# Altium PCB SBH_Charger.PcbDoc (part 3 of 3)
Units mil, origin at the board's own origin, x right, y up, seen from the top; angles counter-clockwise.
Board outline 4700 x 3200 mil, 4 copper layers (Top Layer, Mid Layer 1, Mid Layer 2, Bottom Layer), stack 61.811 mil thick; 160 components, 116 nets, 654 pads, 375 vias.
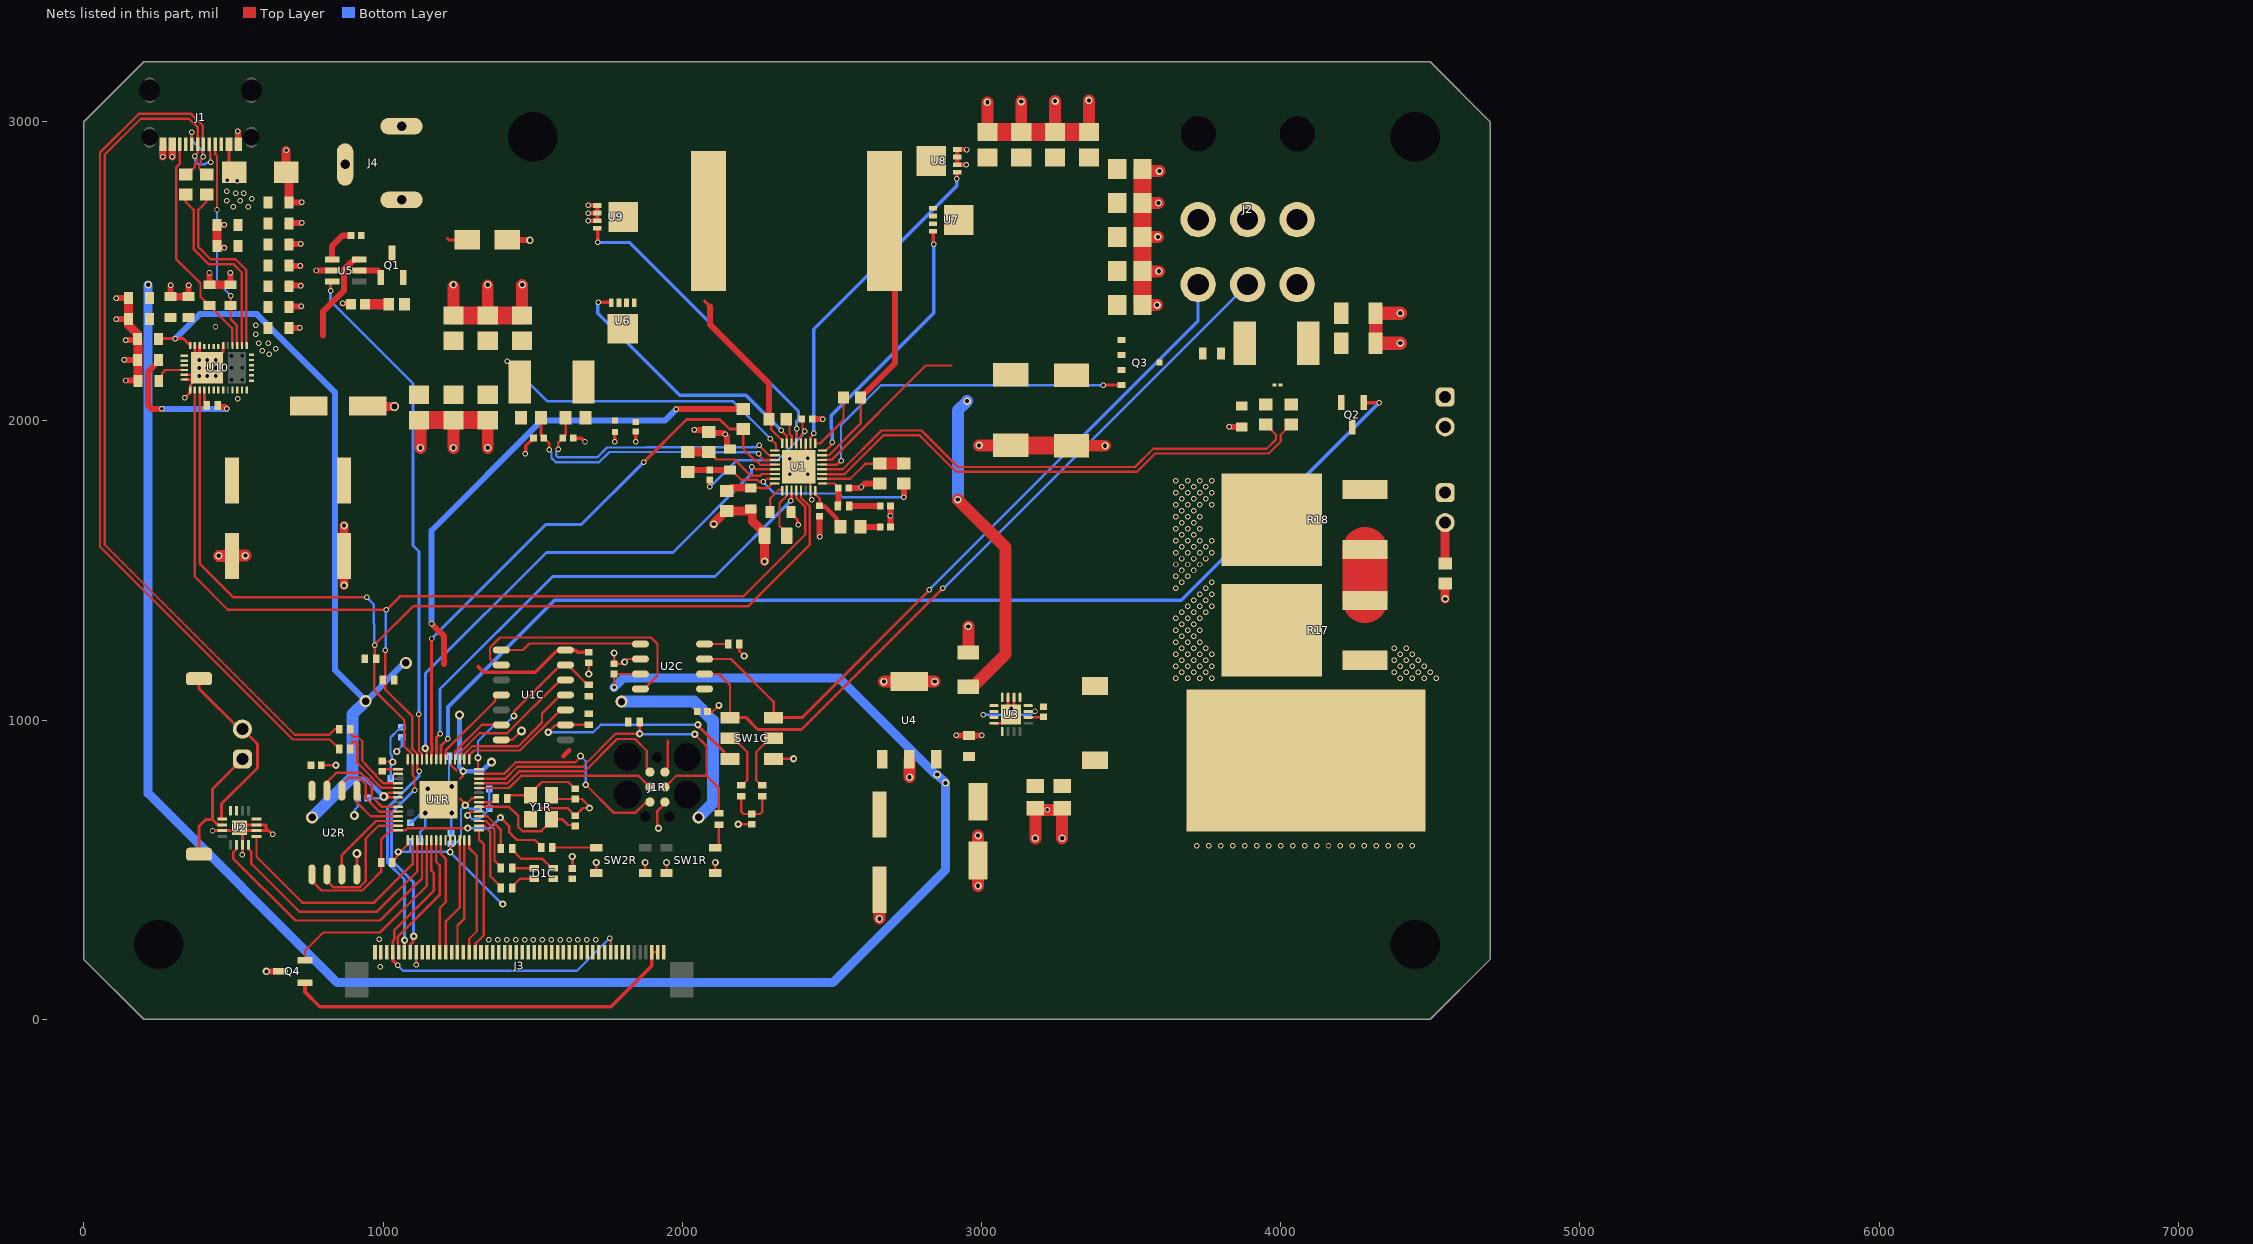
[diagram p4: the nets of this part, all layers, seen from the top]

## Via types
v1: diameter 18.3, hole 11.81, Top Layer to Bottom Layer, tented both sides, 277 vias
v2: diameter 25, hole 14, Top Layer to Bottom Layer, tented both sides, 42 vias
v3: diameter 24, hole 12, Top Layer to Bottom Layer, tented both sides, 37 vias
v4: diameter 30, hole 16, Top Layer to Bottom Layer, tented both sides, 10 vias
v5: diameter 40, hole 25, Top Layer to Bottom Layer, tented both sides, 5 vias
v6: diameter 22.3, hole 12, Top Layer to Bottom Layer, tented both sides, 2 vias
v7: diameter 18, hole 11.81, Top Layer to Bottom Layer, tented both sides, 1 vias
v8: diameter 30, hole 20, Top Layer to Bottom Layer, tented both sides, 1 vias

## Nets (pads, with @x,y where several pads share a name; then routed paths per layer and width w, separated by ;. In a path a pad name is that pad's centre, name@x,y a point inside that pad or via, vN(x,y) a via of type N, cw(c..) or ccw(c..) an arc to the next point about the centre after c; other vN are vias at no path point) (continued)
3V3: C1C.1 C3C.1 C3R.1 C4R.1 C5C.1 C5R.1 C6R.1 C7R.1 C8R.1 C9R.1 C10R.1 C13.1 C64.1 D1C.4 J1R.2 J3.1 J3.7 J3.8 J3.9 J3.35 J3.37 J3.40 J3.41 J3.42 R1C.1 R4.1 R4C.1 R4R.1 R5R.1 R28.1 R29.1 U1C.14 U1R.1 U1R.10 U1R.22 U1R.33 U1R.42 U1R.43 U1R.44 U1R.48 U1R.49 U2.4 U2.7 U2.8 U2C.5 U2R.8 U4.3 U10.38 | length 7086
  Top Layer w8: v4@1002.41,741.56 1049.88,741.56 U1R.49@1049.95,741.5 ; v4(1002.41,744.12) 1004.97,744.12 1018.09,757.24 U1R.48@1049.95,757.24 ; C4R.1@1003.15,823.23 C4R.1@997.41,828.98 1004.35,835.92 1049.88,835.92 U1R.43@1049.95,835.98 U1R.43@1064.27,835.98 ; R5R.1@1031.11,524.12 1031.11,528.06 1048.26,545.21 v3@1048.26,554.97 ; v3@1059.53,561.74 U1R.1@1082.85,585.06 ; U1R.42@1082.85,854.57 1082.85,868.89 U1R.42@1082.92,868.96 ; v3(1224,559) 1224.59,559.59 1224.59,598.22 U1R.10@1224.65,598.29 ; U1R.33@1224.65,868.96 1224.71,868.89 1224.71,851.64 1245.41,830.95 ; 1257.27,737.5 1275.01,719.76 v3(1275.01,715.6) 1298.1,738.69 1304.64,738.69 1307.45,741.5 U1R.22@1320.61,741.5 ; 1257.27,803.95 1265.96,812.63 1265.96,827.67 v3(1267.41,829.12) ; J1R.2@1941.91,826.25 1941.91,832.43 1951.91,842.43 1951.91,868.53 1951.91,931.25
  Top Layer w10: C64.1@249.65,2273.54 251.1,2275 v1(305,2275) 305.1,2274.9 333,2274.9 U10.38@355.29,2252.61 ; C5C.1@1632.41,467 C5C.1@1632.41,469.12
  Top Layer w12: 1317.59,1179.12 1336.4,1160.31 1509.01,1160.31 1580.59,1231.9 1607.47,1231.9 U1C.14@1609.69,1234.12 1610.85,1232.97 1643.42,1232.97 1650.14,1226.25 C1C.1@1687.41,1226.25
  Top Layer w16: v4(1362.41,859.12) v4@1366.19,859.12 ; 1603.59,880.31 1621.22,897.93
  Top Layer w20: v1(1162,1322) 1204,1280 1204,1187 ; v1(1980.5,2039.5) R4.1@2204,2039.5
  Bottom Layer w8: C5R.1@949.53,739.12 991.45,739.12 996.45,744.12 v4(1002.41,744.12) ; v3(1046,895) 1046,896.13 1062.41,912.54 C10R.1@1062.41,939.12 ; v3@1055.77,560.4 1222.6,560.4 v3(1224,559) ; 1090.28,561.68 C7R.1@1090.28,594.12 ; v3(1275.01,715.6) 1275.01,715.37 v3@1273.96,714.32 ; C8R.1@1320.28,704.12 1289.84,704.12 1276.4,717.57 1273.96,717.57 v3@1273.96,714.32 ; v3(1400,385) 1398,385 v3(1224,559) ; v3(1224,559) 1225.7,560.7 1225.7,585.29 C6R.1@1227.41,587 1232.36,591.95 1246.25,591.95 1260.65,606.35 1260.65,701.01 v3@1273.96,714.32
  Bottom Layer w16: 902.41,804.12 942.41,804.12 v4@997.41,749.12 ; v4(1256,1017) 1255.27,1016.27 1255.27,879.86 C9R.1@1254.53,879.12 1254.53,843.08 1267.41,830.2 v3(1267.41,829.12) 1329.98,829.12 1359.98,859.12 v4(1362.41,859.12)
  Bottom Layer w20: v1(305,2275) 387,2357 578,2357 838.87,2096.13 838.87,1167.65 v5@935.26,1071.26 ; v5(941.6,1063.32) 943.46,1063.32 1071.14,1191 v5(1076,1191) ; v1(1162,1322) 1162,1633 1531,2002 1943,2002 v1(1980.5,2039.5)
  Bottom Layer w40: v5(763,675) 763.28,675 897.41,809.12 897.41,1019.12 v5(941.6,1063.32) ; v5(1797,1062) 2038.73,1062 2102.41,998.33 2102.41,722.41 v5(2055,675)
  other v3: 1050.55,559.44
5V: C4C.1 C12.1 C14.1 C16.1 C17.1 C53.1 C54.1 C55.1 C56.1 L2.1 U2C.3 U3.5 U4.1 U10.34 U10.35 | length 6471.5
  Top Layer w8: v3(1772.41,1109.12) C4C.1@1772.41,1154.12 U2C.3@1860.12,1154.12
  Bottom Layer w30: v2(215,2455) 215,755 847.54,122.46 2502.46,122.46 2880,500 v2(2880,790) v2(2852,818) 2846.81,818 2524.81,1140 1803.28,1140 v3(1772.41,1109.12)
AC_N: C46.1 R25.2 U1.2 | length 904.2
  Top Layer w8: v1(1586.15,1905.53) 1586.15,1928.28 1593.06,1935.19 1593.85,1935.19 1600.87,1942.21 1600.87,1943.79 1610,1952.91 R25.2@1610,2010 ; v1(2257,1918) 2257.16,1918 2289.79,1885.37 U1.2@2311.24,1885.37
  Bottom Layer w8: v1(1586.15,1905.53) 1586.15,1902.89 1579.11,1895.84 1579.11,1883.05 1583.79,1878.37 1716.22,1878.37 1748.95,1911.09 1879.86,1911.09 1880.52,1911.75 2247.96,1911.75 2254.21,1918 v1(2257,1918)
AC_P: C45.1 R24.2 U1.3 | length 929.4
  Top Layer w8: C45.1@1537.13,1943 1556.06,1924.06 v1(1556.06,1903) ; v1(2255.93,1889.5) 2255.93,1886.72 2261.2,1881.44 2261.2,1879.89 2271.47,1869.62 U1.3@2311.24,1869.62
  Top Layer w10: R24.2@1528.5,2010 1528.5,1952.41 1537.13,1943.79 C45.1@1537.13,1943
  Bottom Layer w8: v1(1556.06,1903) 1556.06,1900.36 1563.11,1893.31 1563.11,1876.43 1577.17,1862.37 1722.85,1862.37 1756.63,1896.15 2004.41,1896.15 2004.8,1895.75 2246.89,1895.75 2253.14,1889.5 v1(2255.93,1889.5)
AUDIOIN: U1R.2 U2.1 | length 785.4
  Top Layer w8: U2.1@577,610.47 577,543 730,390 970,390 1098.67,518.67 U1R.2@1098.67,598.29
BATDRV: Q3.4 U1.21 | length 1175.9
  Top Layer w8: U1.21@2466.76,1853.87 2516.87,1853.87 2529.24,1866.24 v1(2530.76,1866.24)
  Top Layer w9.84: v1(3407,2119) 3407.5,2119.5 3461.93,2119.5 Q3.4@3462.43,2119
  Bottom Layer w8: v1(2530.76,1866.24) 2530.76,1985.76 2664,2119 v1(3407,2119)
BCLK: U1R.3 U2.16 | length 847.6
  Top Layer w8: U2.16@549.53,583 550.53,582 550.53,569.47 560,560 560,520 720,360 980,360 1114.41,494.41 U1R.3@1114.41,598.29
BKLIGHT: J3.2 J3.3 Q4.2 | length 1332.9
  Top Layer w9.84: J3.3@1898.29,224 J3.2@1917.98,224
  Top Layer w12: Q4.2@739,122.5 739,91 788,42 1762,42 1898.29,178.29 J3.3@1898.29,224
BTST1: C27.1 U1.30 | length 91.6
  Top Layer w8: C27.1@2347.54,2006 2358.57,1994.97 2358.57,1956.91 2365.38,1950.1 U1.30@2365.38,1921.81
BTST2: C28.1 U1.25 | length 202.6
  Top Layer w8: U1.25@2444.12,1924.35 2460.66,1924.35 2539,2002.69 C28.1@2539,2078
CANCLK_RP2CAN: U1C.6 U1R.32 | length 217.3
  Top Layer w8: U1R.32@1240.4,868.96 1240.46,869.02 1240.46,894.46 1330.12,984.12 U1C.6@1395.12,984.12
CANH: J2.4 SW1C.4 U2C.7 | length 2434.3
  Top Layer w8: U2C.7@2074.69,1204.12 2162.41,1204.12 2305.24,1061.29 SW1C.4@2305.24,1008.02
  Top Layer w9.84: SW1C.4@2305.24,1008.02 2400,1008.02
  Top Layer w10: 2400,1008.02 2825,1433.02 v1(2825,1435)
  Bottom Layer w10: v1(2825,1435) 3724.29,2334.29 J2.4@3724.29,2456.06
CANL: J2.5 SW1C.1 U2C.6 | length 2571.6
  Top Layer w8: U2C.6@2074.69,1154.12 2122.41,1154.12 2159.57,1116.96 SW1C.1@2159.57,1008.02
  Top Layer w9.84: 2341,968.81 2398.81,968.81 v1(2870,1440)
  Top Layer w10: SW1C.1@2159.57,1008.02 2213.51,1008.02 2252.72,968.81 2341,968.81
  Bottom Layer w9.84: v1(2870,1440) 2871.56,1441.56 2875.14,1441.56 J2.5@3889.65,2456.06
CANRX_RP2CAN: U1C.2 U2C.4 | length 847.6
  Top Layer w8: U1C.2@1395.12,1184.12 1378.39,1184.12 1357.58,1204.93 1357.58,1242.74 1390.77,1275.93 1895.59,1275.93 1917.41,1254.12 1917.41,1148.9 1872.63,1104.12 U2C.4@1860.12,1104.12
CANTX_RP2CAN: U1C.1 U2C.1 | length 474.9
  Top Layer w8: U1C.1@1395.12,1234.12 1467.41,1234.12 1489.41,1256.12 1858.12,1256.12 U2C.1@1860.12,1254.12
CC1: C58.1 J1.A5 U10.28 | length 703.3
  Top Layer w8: J1.A5@439.21,2925.16 439.21,2890.52 445,2884.73 v1(445,2705) ; v1(491,2419) 491,2386 C58.1@490,2385 490,2340 511.51,2318.49 U10.28@511.51,2252.61
  Bottom Layer w8: v1(445,2705) 445,2465 v1(491,2419)
CC2: C57.1 J1.B5 U10.29 | length 761.2
  Top Layer w8: J1.B5@321.1,2925.16 321.1,2859.83 308.5,2847.23 308.5,2541.5 390,2460 390,2415 404,2401 404,2396 415,2385 C57.1@420,2385 425,2385 436,2374 436,2369 495.76,2309.24 U10.29@495.76,2252.61
CELL_BAT: R2.2 R3.1 U1.18 | length 296.1
  Top Layer w8: U1.18@2464.81,1806.63 2466.76,1806.63 2561.63,1806.63 2612,1857 R3.1@2660,1857
  Top Layer w40: R3.1@2660,1857 R2.2@2740,1857
CHRG_OK: R4.2 U1.4 U1R.37 | length 1946.9
  Top Layer w8: R4.2@2204,1972.5 2204,1906.3 2242.71,1867.59 2246.93,1867.59 2260.65,1853.87 U1.4@2313.19,1853.87
  Top Layer w9.84: U1R.37@1162.64,881.26 1162.64,896.64 1162.92,896.92 1162.92,915.08 1162.64,915.36 v1(1162.64,1272.64) ; v1(1871,1862) 2014,2005 2125,2005 2157.5,1972.5 R4.2@2204,1972.5
  Bottom Layer w9.84: v1(1162.64,1272.64) 1543,1653 1662,1653 v1(1871,1862)
CSX: J3.38 U1R.12 | length 393.7
  Top Layer w8: J3.38@1209.32,224 1209.32,327.32 1256.15,374.15 U1R.12@1256.15,598.29
D_N: SB2.1 U10.27 | length 630.1
  Top Layer w8: SB2.1@340,2756.5 340,2732.5 367,2705.5 367,2574 417,2524 500,2524 527.32,2496.68 U10.27@527.32,2252.61
D_P: SB1.1 U10.26 | length 630.1
  Top Layer w8: SB1.1@410,2756.5 410,2732.5 383,2705.5 383,2580.63 423.63,2540 506.63,2540 543.32,2503.3 U10.26@543.32,2252.61
DBG_TX_RP2040: J1R.5 U1R.27 | length 737.1
  Top Layer w8: U1R.27@1320.61,820.24 1404.61,820.24 1443.5,859.12 1642.48,859.12 1660,876.64 v6(1660,880) ; v6(1677.41,784.12) 1770.78,690.75 1844.03,690.75 1875.13,721.85 1887.51,721.85 J1R.5@1891.91,726.25
  Bottom Layer w8: v6(1660,880) 1677.41,862.59 v6(1677.41,784.12)
DrainLED: J6.1 J7.2 Q2.3 R18.2
DSWITCH: Q2.1 U1R.35 | length 3769.7
  Top Layer w9.84: U1R.35@1193.15,868.96 1193.15,913.15 v1(1217,937)
  Top Layer w12: Q2.1@4277.5,2061 v1(4329,2061)
  Bottom Layer w12: v1(1217,937) 1217,1043.99 1573.01,1400 3668,1400 v1(4329,2061)
GND: C1C.2 C1R.2 C2C.1 C2R.2 C3.2 C3C.2 C3R.2 C4.2 C4C.2 C4R.2 C5.2 C5C.2 C5R.2 C6.2 C6R.2 C7.1 C7R.2 C8.2 C8R.2 C9.2 C9R.2 C10.2 C10R.2 C11R.2 C12.2 C12R.2 C13.2 C13R.2 C14.2 C15.2 C16.2 C17.2 C18.2 C19.1 C20.1 C21.1 C22.2 C23.1 C24.2 C25.2 C26.2 C29.2 C30.2 C31.2 C32.2 C33.2 C34.2 C35.2 C36.2 C37.2 C38.2 C39.2 C40.2 C41.2 C42.2 C44.2 C45.2 C46.2 C47.1 C48.2 C49.2 C50.2 C51.2 C52.2 C53.2 C54.2 C55.2 C56.2 C57.2 C58.2 C59.2 C60.2 C61.2 C62.2 C63.2 C64.2 C67.2 C68.2 CR1.2 CR2.2 J1.A1-B12 J1.B1-A12 J1R.6 J2.1 J2.2 J2.3 J3.11 J3.12 J3.13 J3.14 J3.15 J3.16 J3.17 J3.18 J3.19 J3.20 J3.21 J3.22 J3.23 J3.24 J3.25 J3.26 J3.27 J3.28 J3.29 J3.30 J3.31 J3.32 J3.43 J3.48 J3.49 J3.50 J4.B J4.C J7.1 pad.213 Q4.3 R3.2 R6C.2 R14.2 R15.2 R16.2 R17.1 R17.3 R18.3 R31.2 SW1C.6 SW1R.B1 SW1R.B2 SW2R.B1 SW2R.B2 U1.15 U1.27 U1.33 U1C.7 U1R.19 U1R.57 U2.2 U2.3 U2.11 U2.15 U2.17 U2C.2 U2R.4 U3.4 U3.14 U3.15 U3.17 U4.2 U4.4 U5.2 U8.1 U8.2 U8.3 U9.1 U9.2 U9.3 U10.5 U10.6 U10.7 U10.11 U10.12 U10.13 U10.14 U10.16 U10.17 U10.18 U10.19 U10.31 U10.36 U10.37 U10.39 U10.45 U10.46 U10.47 U10.49 U10.50 U10.51 U10.53 U10.54 U10.55 Y1R.2 Y1R.4 | length 10872.5
  Top Layer w8: U10.5@343.42,2154.24 343.42,2154.37 363.78,2154.37 U10.39@369.25,2159.84 ; C3R.2@796.52,849.12 v3(842.41,849.12) ; C4R.2@997.41,863.23 999.06,861.58 1030.75,861.58 v3(1032.41,859.92) ; v1(1111,181.91) 1110.94,181.96 1110.94,223.94 J3.43@1110.89,224 J3.43@1112.8,225.91 ; v3(1282.52,681.55) 1282.52,684.02 1292.75,694.25 U1R.19@1320.61,694.25 ; U1C.7@1395.12,934.12 1432.41,934.12 v4(1462.41,964.12) ; Y1R.4@1492.41,668.23 1492.41,674.14 1524.06,705.79 1616.19,705.79 1641.62,680.36 C1R.2@1642.41,680.36 1643.19,680.36 1668.84,706 v3(1690,706) 1686.94,709.06 1686.94,713.7 1664.53,736.1 C2R.2@1642.41,736.1 1574.53,736.1 Y1R.2@1562.41,748.23 ; v3(1687.41,1154.12) C1C.2@1687.41,1192 ; SW2R.B1@1712.41,489.12 v3(1712.41,524.12) v3@1712.41,529.12 ; C4C.2@1772.41,1188.37 1801.66,1188.37 v3(1807.41,1194.12) 1817.41,1204.12 U2C.2@1860.12,1204.12 ; C4C.2@1772.41,1189.12 v3(1772.41,1224.12) ; SW2R.B2@1875.79,489.12 v3(1875.79,524.12) ; v3(1920.68,638.25) 1916.91,642.02 1916.91,696.29 1941.91,721.29 J1R.6@1941.91,726.25 ; SW1R.B1@1947.41,489.12 v3(1947.41,524.12) ; SW1R.B1@1949.02,486.8 SW1R.B1@1951.7,484.12 ; C3C.2@2084.53,1029.12 2085,1029.59 2102.87,1029.59 v3(2122.41,1049.12) ; SW1R.B2@2110.79,489.12 SW1R.B2@2112.41,490.74 ; SW1R.B2@2110.79,490.74 v3(2110.79,524.12) ; v3@2187.41,649.12 v3@2188.84,650.56 ; v3@2188.84,652 C2C.1@2230.97,652 ; R6C.2@2191.11,1254.12 2191.11,1230.42 v3(2207.41,1214.12) ; C2C.1@2230.97,650.56 C2C.1@2232.41,652 ; SW1C.6@2305.24,870.22 2306.02,871 v3(2372,871) ; U1.27@2412.62,1923.76 2412.62,1869.62 U1.33@2389,1846 ; v1(2420,1821) 2395,1846 U1.33@2389,1846 ; v1(2432.58,1735.76) 2432.58,1738.55 2428.58,1742.55 2428.58,1768.03 2428.37,1768.24 2428.37,1806.63 U1.33@2389,1846 ; C7.1@2432.94,2009.94 C7.1@2435.44,2007.44 ; U3.4@3041.91,989.47 3042.1,989.66 U3.17@3069.66,989.66
  Top Layer w9.84: C64.2@179.65,2273.54 C64.2@180.35,2272.83 ; C63.2@180.35,2132.83 C63.2@180.35,2135 ; U10.6@335.61,2138.43 374.41,2138.43 356.28,2120.3 356.28,2103.98 U10.7@355.29,2103 354.31,2102.02 354.31,2093.31 v1(338,2077) ; U10.37@371.04,2252.61 371.04,2218.54 U10.45@385.62,2203.97 ; U10.45@386.79,2202.8 U10.36@386.79,2252.61 ; U10.39@411.79,2177.8 413.78,2177.8 465.53,2229.55 U10.31@465.53,2252.61 ; C51.2@685,2310 C51.2@686,2309 ; CR1.2@1415,2605 CR1.2@1416,2604 ; C8.2@2364,1696 2364,1691 2385.57,1669.43 2385.57,1654.43 v1(2387,1653) ; U3.17@3089.16,1028.84 U3.15@3089.16,1076.09 ; U3.17@3099,1019 v1(3099,1039) ; U3.17@3099,1042.23 3103.92,1042.23 3108.84,1047.15 U3.14@3108.84,1076.09
  Top Layer w10: v1(430,630) 430.16,630.16 U2.11@463,630.16 510.16,630.16 U2.17@520,640 ; v1(529.28,549.8) 529.84,550.36 U2.15@529.84,583 U2.17@529.84,630.16 ; v1(631,619) 628.75,619 617.6,630.16 608,630.16 ; U2R.4@912.27,484.36 U2R.4@912.27,484.36 912.34,554.05 v4(912.41,554.12) ; C5C.2@1632.41,503.95 v3(1632.41,544.12) ; U2.17@520,640 U2.17@529.84,630.16 ; U2.17@520,640 529.84,649.84 U2.3@577,649.84 608,649.84 608,630.16 ; U2.17@529.84,630.16 U2.2@577,630.16 608,630.16
  Top Layer w12: v1(1476,1890) 1477.21,1891.21 1477.21,1916.54 C45.2@1502.87,1942.21 ; C46.2@1635.13,1943 1639.71,1943 1640.15,1942.56 1662.44,1942.56 v1(1675,1930) ; v1(1775,1931) C18.2@1775,1961.32 ; C22.2@1844.73,1963.98 1844.73,1931.27 v1(1845,1931)
  Top Layer w15: v1(1685.18,2720.18) U9.1@1716,2720.18 U9.2@1716,2694.59 ; v1(1685.41,2694.59) U9.2@1716,2694.59 ; v1(1686,2669) U9.3@1716,2669 U9.2@1716,2694.59 ; v1(2950,2856) 2949.9,2856.1 2919.13,2856.1 U8.3@2919.02,2856.2 U8.2@2919.02,2881.8 U8.1@2919.02,2907.39 2950.61,2907.39 v1(2951,2907)
  Top Layer w20: v1(109,2340) C56.2@150,2340 ; v1(109,2410) C55.2@150,2410 ; v1(135,2204) 135.46,2203.54 C62.2@179.65,2203.54 ; v1(140,2135) C63.2@180.35,2135 ; v1(140,2270) C64.2@176.1,2270 ; C54.2@290,2415 v1(290,2454) ; C53.2@350,2415 v1(350,2454) ; C57.2@420,2455 v1(420,2495) ; C23.1@445,2585 445,2584 450,2579 v1(470,2579) ; C68.2@445,2655 v1(470,2655) ; C58.2@490,2455 v1(490,2495) ; C59.2@495,1549 C59.2@496,1550 ; v1(515,2968) 515.98,2967.02 J1.A1-B12@515.98,2925.16 ; v2(610,160) Q4.3@657,160 ; C49.2@685,2383 v1(727,2383) ; C52.2@685,2452 v1(725,2452) ; C50.2@685,2518 v1(724,2518) ; C48.2@685,2592 v1(725,2592) ; C67.2@685,2662 v1(728,2662) ; C21.1@685,2730 v1(728,2730) ; C51.2@686,2309 688,2311 v1(721,2311) ; v1(776,2502.62) U5.2@830,2502.6 ; v1(865.13,2392.91) 889.67,2392.91 C44.2@892.58,2390 ; CR1.2@1416,2604 v2(1491,2604) ; v1(2040,1970) 2082,1970 R16.2@2089,1963 2092,1960 2138,1960 v1(2143,1955) 2149.72,1948.28 2149.72,1911 2154.72,1906 C9.2@2159,1906 ; C7.1@2434,2006 v1(2469,2006) ; v1(2459,1613) C3.2@2459,1681.75 ; C6.2@2556.13,1776 2596,1776 v1(2599,1779) 2610,1790 R3.2@2660,1790 ; C4.2@2696.13,1646 2696,1646.13 v1(2696,1683) 2696,1715.87 C5.2@2696.13,1716 ; v1(2916,949) C12.2@2959,949 v1(3001,949) ; v1(3828,1981) 3829,1980 C47.1@3870,1980 C47.1@3872,1982
  Top Layer w24: v1(264,2883) J1.B1-A12@264,2914.32
  Top Layer w25: C54.2@290,2415 C53.2@350,2415
  Top Layer w30: C55.2@150,2410 C56.2@150,2340 150,2320 C64.2@179.65,2290.35 ; C63.2@180.35,2135 C64.2@180.35,2272.83 ; C57.2@420,2455 C58.2@490,2455 ; C23.1@445,2600 C68.2@445,2655 C68.2@445,2660 ; CR2.2@676.23,2831 v1(676.23,2904.39) ; CR2.2@676.61,2830 685,2821.61 C21.1@685,2730 ; C49.2@685,2383 C49.2@685,2385 ; C52.2@685,2452 C52.2@685,2455 ; C50.2@685,2518 C50.2@685,2520 C50.2@685,2525 ; C48.2@685,2592 C48.2@685,2595 ; C67.2@685,2660 C67.2@685,2662 ; v2(870,1450) C60.2@870,1549 v2(870,1650) ; C61.2@948.43,2050 949.93,2048.5 v8(1038.08,2048.5) ; v2(2105,1655) 2105,1657.5 2146.5,1699 R15.2@2149,1699 2217,1699 2224,1706 C10.2@2229,1706 2234,1706 2234,1664 2239,1659 2240.65,1659 2270.69,1628.95 2270.69,1620.69 R14.2@2275.38,1616 v2(2275.38,1530.38) ; v2(4550,1405) R31.2@4550,1456.5
  Top Layer w40: v2(451,1549) C59.2@495,1549 ; C59.2@496,1550 v2(540,1550) ; C32.2@1120,2002.63 1123,2002.63 1125,2000.63 v2(1125,1910) ; v2(1235,1910) C33.2@1235,2002.63 ; C29.2@1235,2352.37 v2@1235,2450 ; v2(1350,1910) C34.2@1350,2002.63 ; C30.2@1350,2352.37 v2@1350,2452 ; C31.2@1465,2352.37 v2(1465,2455) ; v2(2659,336) C13.2@2659,433 C13.2@2659,486.5 ; v2(2673.84,1128.84) U4.4@2759,1128.84 v2(2843.84,1128.84) ; v2(2760,809) U4.2@2760,868 ; C15.2@2956,1226.48 v2(2956,1313) ; v2(2989,446) C14.2@2989,530.57 v2(2989,614) ; v2(2991.89,1917.89) C20.1@3098,1917.89 ; C24.2@3020,2965.37 v2(3020,3065) ; C40.2@3133,2965.37 v2(3133,3067) ; v2(3180,605) C16.2@3180,704.88 ; C16.2@3180,705.2 C16.2@3180,704.88 ; C35.2@3246,2965.37 v2(3246,3069) ; v2(3270,605) 3270,704.88 3265.12,700 v1(3220,700) 3210.47,700 3209.73,700.74 3184.14,700.74 C16.2@3180,704.88 ; C19.1@3301,1916.89 v2(3413.11,1916.89) ; C36.2@3359,2965.37 v2(3359,3071) ; C41.2@3538.37,2387 v2(3587,2387) ; C39.2@3538.37,2500.75 3539.12,2500 v2(3593,2500) ; C42.2@3538.37,2614.5 3538.87,2615 v2(3590,2615) ; C38.2@3538.37,2728.25 v2(3591.75,2728.25) ; C37.2@3538.37,2842 3545.37,2835 v2(3595,2835)
  Top Layer w45: v2(4400,2260) C25.2@4317.48,2260 C26.2@4317.48,2360 v2(4400,2360)
  Top Layer w60: C32.2@1123,2002.63 C33.2@1235,2002.63 C34.2@1350,2002.63 ; C29.2@1235,2352.37 C30.2@1350,2352.37 C31.2@1465,2352.37 ; C24.2@3020,2965.37 C40.2@3133,2965.37 C35.2@3246,2965.37 C36.2@3359,2965.37 ; C20.1@3098,1917.89 3098.5,1917.39 3300.5,1917.39 C19.1@3301,1916.89 ; C41.2@3538.37,2387 C39.2@3538.37,2500.75 C42.2@3538.37,2614.5 C38.2@3538.37,2728.25 C37.2@3538.37,2842
  Bottom Layer w8: v4@902.41,684.12 906,687.72 906,701 915.28,710.28 C5R.2@915.28,739.12 ; C11R.2@1025.28,804.12 1025.28,849.55 1032.41,856.67 v3(1032.41,859.92) 1029.34,862.98 1029.34,881.96 1025,886.3 1025,941.57 1052.66,969.22 1055.38,969.22 C10R.2@1062.41,976.25 ; C13R.2@1092.41,657 1099.43,664.02 1102.15,664.02 1123.05,684.91 1136.57,684.91 v4(1140.78,689.12) 1140.78,642.5 1124.53,626.25 C7R.2@1124.53,594.12 ; C9R.2@1220.28,879.12 1220.28,793.58 1229.78,784.08 v4(1229.78,778.12) ; C6R.2@1227.41,621.25 1227.41,684.12 v4@1232.41,689.12 ; v3(1282.52,681.55) 1285.77,681.55 1298.2,669.12 1322.26,669.12 1341.3,688.17 1347.51,694.37 1347.51,697.1 C8R.2@1354.53,704.12 C12R.2@1354.53,769.12
  other v1: 990,176 1354,266 1383.75,266 1413.5,266 1443.25,266 1473,266 1502.75,266 1532.5,266 1562.25,266 1592,266 1621.75,266 1651.5,266 1681.25,266 1711,266 987,268 3720,580 3760,580 3800,580 3840,580 3880,580 3920,580 3960,580 4000,580 4040,580 4080,580 4120,580 4160,580 4200,580 4240,580 4280,580 4320,580 4360,580 4400,580 4440,580 3650,1140 3690,1140 3730,1140 3770,1140 4400,1140 4440,1140 4480,1140 4520,1140 3670,1160 3710,1160 3750,1160 4380,1160 4420,1160 4460,1160 4500,1160 3650,1180 3690,1180 3730,1180 3770,1180 4400,1180 4440,1180 4480,1180 3670,1200 3710,1200 3750,1200 4380,1200 4420,1200 4460,1200 3650,1220 3690,1220 3730,1220 3770,1220 4400,1220 4440,1220 3670,1240 3710,1240 3750,1240 4380,1240 4420,1240 3650,1260 3690,1260 3730,1260 3670,1280 3710,1280 3650,1300 3690,1300 3730,1300 3670,1320 3710,1320 3650,1340 3690,1340 3730,1340 3670,1360 3710,1360 3750,1360 3690,1380 3730,1380 3770,1380 3710,1400 3750,1400 3730,1420 3770,1420 3650,1440 3750,1440 3670,1460 3770,1460 3650,1480 3690,1480 3670,1500 3710,1500 3650,1520 3690,1520 3730,1520 3670,1540 3710,1540 3750,1540 3650,1560 3690,1560 3730,1560 3770,1560 3670,1580 3710,1580 3750,1580 3650,1600 3690,1600 3730,1600 3770,1600 3670,1620 3710,1620 3650,1640 3690,1640 3730,1640 3670,1660 3710,1660 3650,1680 3690,1680 3730,1680 3670,1700 3710,1700 3650,1720 3690,1720 3730,1720 3770,1720 3670,1740 3710,1740 3750,1740 3650,1760 3690,1760 3730,1760 3770,1760 3670,1780 3710,1780 3750,1780 3650,1800 3690,1800 3730,1800 3770,1800 2360,1821 2360,1873 2419,1875 515,2074
  other v2: 1235,2455 1350,2455
  other v3: 2187.41,652
  other v4: 903.86,680.95 1229.78,689.12 1149.24,770.48
HIDRV1: U1.31 U6.4 | length 895.1
  Top Layer w8: v1(2330.55,1968.31) 2349.42,1949.44 U1.31@2349.42,1936.49
  Top Layer w9.84: U6.4@1761.82,2396 U6.4@1762.82,2395
  Top Layer w12: v1(1719,2396) U6.4@1761.82,2396
  Bottom Layer w12: v1(1719,2396) 1718,2395 1718,2360 1992,2086 2212.86,2086 v1(2330.55,1968.31)
HIDRV2: U1.24 U7.4 | length 898.6
  Top Layer w8: U1.24@2467.35,1901.12 2479.87,1901.12 2500.03,1921.28 2500.03,1926.03 v1(2502,1928)
  Top Layer w9.84: U7.4@2837.98,2633.61 U7.4@2838.99,2632.6 ; v1@2838.99,2591.01 v1(2840,2590)
  Top Layer w12: v1@2838.99,2591.01 U7.4@2838.99,2632.6
  Bottom Layer w12: v1(2502,1928) 2502,1971.59 2497.74,1975.85 2497.74,2017.74 2840,2360 v1(2840,2590)
ILIM_HIZ: R13.2 R16.1 U1.6 | length 330.4
  Top Layer w8: R16.1@2089,1896 2091.5,1896 2107.5,1880 2107.5,1877.5 2114,1871 2174.77,1871 2228.52,1817.25 2261.37,1817.25 2266.49,1822.38 U1.6@2313.19,1822.38
  Top Layer w30: R13.2@2019,1896 R16.1@2089,1896
INT_RP2CAN: U1C.4 U1R.34 | length 286.4
  Top Layer w8: U1R.34@1208.97,882.18 1208.97,898.18 1375.4,1064.62 1375.4,1076.91 1382.62,1084.12 U1C.4@1395.12,1084.12
IRQ: J3.46 U1R.7 | length 438.6
  Top Layer w8: J3.46@1051.83,224 1049.93,225.91 1049.93,253.61 1048.58,254.96 1048.58,274.74 1189,415.16 1189,515 1177.41,526.59 U1R.7@1177.41,598.29
LDO_1V5: C63.1 U10.4 | length 118.8
  Top Layer w8: C63.1@250.35,2132.83 261.08,2143.56 261.08,2158.08 272.93,2169.93 U10.4@345.3,2169.93
LDO_3V3: C62.1 R30.2 U10.1 U10.2 U10.3 | length 469.3
  Top Layer w20: C62.1@249.65,2203.54 244.65,2198.54 244.65,2193.54 215,2163.9 215,2051.72 226.72,2040 v1(260,2040) ; R30.2@447.7,2051.21 447.7,2047.27 448.53,2046.45 471.55,2046.45 v1(477,2041)
  Bottom Layer w20: v1(260,2040) 476,2040 v1(477,2041)
LEDB_RP2CAN: R8C.1 U1R.18 | length 153.7
  Top Layer w8: U1R.18@1320.61,678.5 1348.02,678.5 1393.71,632.82 R8C.1@1393.71,571.14
LEDG_RP2CAN: R7C.1 U1R.17 | length 201.5
  Top Layer w8: U1R.17@1320.61,662.76 1343.77,662.76 1372.41,634.12 1372.41,530.37 1393.71,509.07 R7C.1@1393.71,505.13
LEDR_RP2CAN: R5C.1 U1R.16 | length 248.3
  Top Layer w8: U1R.16@1320.61,647.01 1337.84,647.01 1339.65,645.2 1358.41,626.47 1358.41,478.36 1393.71,443.06 R5C.1@1393.71,439.12
LODRV1: U1.29 U9.4 | length 1050.7
  Top Layer w9.84: U9.4@1716,2643.41 U9.4@1717,2642.41 ; v1@1717,2598 v1(1718,2597)
  Top Layer w10: U1.29@2381.56,1936.08 2381.56,1972.56 v1(2382,1973)
  Top Layer w12: v1@1717,2598 U9.4@1717,2642.41
  Bottom Layer w10: v1(1718,2597) 1823,2597 2389,2031 2389,2006.62 2382,1999.62 v1(2382,1973)
LODRV2: U1.26 U8.4 | length 1097.7
  Top Layer w9.84: U1.26@2428.37,1936.16 2428.37,1944.2 2439.98,1955.81 v1(2439.98,1958.1) ; v1(2918,2810) 2918.51,2810.51 2918.51,2830.1 U8.4@2919.02,2830.61
  Bottom Layer w12: v1(2439.98,1958.1) 2439.98,2306.73 2918,2784.75 v1(2918,2810)
LRCLK: U1R.4 U2.14 | length 953.2
  Top Layer w8: U2.14@510.16,583 509.16,582 509.16,567.96 499.02,557.82 499.02,537.87 706.89,330 990,330 1130.16,470.16 U1R.4@1130.16,598.29
MISO_RP2CAN: U1C.12 U1R.31 | length 475.9
  Top Layer w8: U1R.31@1256.15,868.96 1256.21,869.02 1256.21,890.41 1321.73,955.93 1414.77,955.93 1592.96,1134.12 U1C.12@1609.69,1134.12
MOSI_RP2CAN: U1C.11 U1R.30 | length 455.3
  Top Layer w8: U1R.30@1271.89,868.96 1271.96,869.02 1271.96,886.36 1297.91,912.31 1452.31,912.31 1531.36,991.36 1531.36,1022.53 1592.96,1084.12 U1C.11@1609.69,1084.12
nCS_RP2CAN: R4C.2 U1C.13 U1R.28 | length 603
  Top Layer w8: v3(1317.41,874.12) 1317.41,836.05 1317.47,835.98 U1R.28@1320.61,835.98 ; v3(1437.41,1014.12) 1437.6,1014.32 1437.6,1029.04 1592.68,1184.12 U1C.13@1602.41,1184.12 ; U1C.13@1609.69,1184.12 1622.19,1184.12 1629.41,1176.91 1629.41,1171.88 1676.64,1124.65 1682.41,1118.89 R4C.2@1682.41,1114.12
  Bottom Layer w8: v3(1317.41,874.12) 1317.41,929.12 1371.82,983.54 1406.82,983.54 v3(1437.41,1014.12)
NetC1_2: C1.2 U5.1 | length 122.4
  Top Layer w20: U5.1@830,2540 830,2585 865,2620 C1.2@892.87,2620
NetC2C_2: C2C.2 R2C.2 R3C.2 | length 179.1
  Top Layer w8: R2C.2@2197.41,745.42 2197.41,694.12 2205.28,686.25 C2C.2@2232.41,686.25 2259.53,686.25 2267.41,694.12 R3C.2@2267.41,745.42
NetC2R_1: C2R.1 R1R.2 Y1R.3 | length 265.2
  Top Layer w8: R1R.2@1414.81,738.23 1414.81,741.4 1421.63,748.23 Y1R.3@1492.41,748.23 1492.41,754.14 1531.5,793.23 1618.74,793.23 1641.62,770.36 C2R.1@1642.41,770.36
NetC3_1: C3.1 R6.1 U1.16 | length 168.1
  Top Layer w8: U1.16@2444.12,1770.19 2444.12,1756.55 2459,1741.66 C3.1@2459,1716
  Top Layer w15: C3.1@2459,1716 2462.52,1712.48 2477.52,1712.48 2516.5,1673.5 2516.5,1658.5 R6.1@2529,1646
NetC4_1: C4.1 R6.2 | length 77.8
  Top Layer w20: R6.2@2595.85,1642.65 R6.2@2601.48,1637.02 ; R6.2@2599.19,1646 C4.1@2661.87,1646 C4.1@2660.14,1647.73
  Top Layer w25: R6.2@2595.85,1642.65 R6.2@2599.19,1646
NetC5_1: C5.1 R7.2 | length 104.2
  Top Layer w20: R7.2@2557.7,1716 C5.1@2661.87,1716
NetC6_1: C6.1 R7.1 U1.17 | length 124.3
  Top Layer w8: U1.17@2464.81,1790.88 2507.78,1790.88 2521.87,1776.79 C6.1@2521.87,1776
  Top Layer w20: R7.1@2520.3,1716 2520.3,1719.94 2521.87,1721.51 C6.1@2521.87,1776
NetC8_1: C8.1 U1.9 | length 97.2
  Top Layer w8: C8.1@2294,1696 2294,1741 2322.57,1769.57 2333.67,1769.57 2333.88,1769.78 U1.9@2333.88,1770.19
NetC10_1: C10.1 R15.1 U1.8 | length 175.3
  Top Layer w8: C10.1@2229,1776 2260.27,1776 2261.29,1774.98 2283.64,1774.98 2299.55,1790.88 U1.8@2313.19,1790.88
  Top Layer w25: R15.1@2149,1766 2151.5,1766 2161.5,1776 C10.1@2229,1776
NetC11_1: C11.1 U3.10 | length 52.6
  Top Layer w8: U3.10@3156.09,1009.16 3206.28,1009.16 C11.1@3208,1010.87
NetC11_2: C11.2 L2.2 U3.1 U3.12 U3.13 U3.16 | length 45.6
  Top Layer w8: C11.2@3198.81,1048.53 3206.21,1041.13 C11.2@3207,1041.13
  Top Layer w30: L2.2@3351.69,1099.49 3366.22,1114.02 L2.2@3380,1114.02
NetC18_1: C18.1 C22.1 R21.2 R25.1 U6.5 U6.6 U6.7 U6.8 U6.9
NetC43_2: C43.2 C47.2 F1.2 R22.1 R26.1
NetC44_1: C44.1 R23.1 | length 78.4
  Top Layer w35: C44.1@940,2390 R23.1@1018.43,2390
NetD1C_1: D1C.1 R5C.2 | length 89.8
  Top Layer w8: R5C.2@1431.11,439.12 1431.11,443.06 1457.75,469.7 D1C.1@1505.91,469.7
NetD1C_2: D1C.2 R7C.2 | length 75.3
  Top Layer w8: R7C.2@1431.11,505.13 D1C.2@1506.4,505.13
NetD1C_3: D1C.3 R8C.2 | length 167.4
  Top Layer w8: R8C.2@1431.11,571.14 1431.11,567.21 1462.14,536.17 1532.94,536.17 1563.98,505.13 D1C.3@1568.9,505.13
NetF1_1: F1.1 Q3.5_8
NetJ5_1: J5.1 L1.1 U2.10 | length 431.8
  Top Layer w9.84: L1.1@385,551.73 385,645 407.5,667.5 430,667.5 ; U2.10@463,649.84 462.92,649.92 447.58,649.92 430,667.5 ; J5.1@530,870 430,770 430,667.5
NetJ5_2: J5.2 L1.2 U2.9 | length 608.1
  Top Layer w9.84: L1.2@385,1138.35 385,1105 520,970 J5.2@530,970 580,920 580,840 460,720 460,669.61 460.08,669.53 U2.9@463,669.53
NetJ6_2: J6.2 R31.1 | length 136.5
  Top Layer w30: R31.1@4550,1523.5 J6.2@4550,1660
NetQ1_1: Q1.1 U5.5 | length 90.5
  Top Layer w20: U5.5@920,2502.6 982.9,2502.6 992.5,2493 Q1.1@992.5,2479
NetQ4_1: Q4.1 U1R.5 | length 680.6
  Top Layer w8: Q4.1@739,197.5 739,229 800,290 990,290 1145.91,445.91 U1R.5@1145.91,598.29
NetR2C_1: R2C.1 SW1C.2 | length 197.8
  Top Layer w8: SW1C.2@2159.57,939.12 2171.38,939.12 2217.41,893.1 2217.41,798.89 2201.34,782.82 R2C.1@2197.41,782.82
NetR3C_1: R3C.1 SW1C.5 | length 197.8
  Top Layer w8: R3C.1@2267.41,782.82 2260.58,789.65 2256.64,789.65 2247.41,798.89 2247.41,893.1 2293.43,939.12 SW1C.5@2305.24,939.12
NetR6C_1: R6C.1 U2C.8 | length 79
  Top Layer w8: U2C.8@2074.69,1254.12 R6C.1@2153.71,1254.12
NetR6R_1: R6R.1 SW1R.A2 | length 85.9
  Top Layer w8: R6R.1@2122.41,650.42 2122.41,582.56 SW1R.A2@2113.61,573.77 ; SW1R.A2@2113.61,573.77 SW1R.A2@2110.79,573.77 SW1R.A2@2113.61,573.77
NetR7R_1: R7R.1 SW2R.A1 | length 146.3
  Top Layer w8: R7R.1@1566.11,574.12 SW2R.A1@1712.41,574.12
NetR14_1: R14.1 U1.10 | length 172.4
  Top Layer w8: R14.1@2349,1616 2349,1624.77 2325,1648.77 2325,1725 2349.63,1749.63 U1.10@2349.63,1768.24
NetR17_2: R17.2 R18.1 | length 170
  Top Layer w150: R17.2@4282.56,1400 R18.1@4282.56,1570
NetR30_1: R30.1 U10.10 | length 55
  Top Layer w9.84: U10.10@402.54,2103 402.54,2062.91 410.3,2055.15 R30.1@410.3,2051.21
NetU1R_9: U1R.9
NetU1R_11: U1R.11
OR_Control: U1R.39 U5.3 | length 1725
  Top Layer w8: v1(1120,1019) 1120,897.27 1130.1,887.18 1130.1,869.02 U1R.39@1130.16,868.96
  Top Layer w9.84: v1(824.75,2435.25) 824.75,2460.12 829.83,2465.2 U5.3@830,2465.2
  Bottom Layer w9.84: v1(824.75,2435.25) 824.75,2400.25 1099.7,2125.3 1099.7,1583.44 1120,1563.14 v1(1120,1019)
OTG/VAP: U1.5 U1R.38 | length 1749.8
  Top Layer w8: v3(1141,906) 1141,901.67 1145.91,896.76 U1R.38@1145.91,868.96 ; v1(2232,1847) 2234.79,1847 2243.66,1838.13 U1.5@2298.51,1838.13
  Bottom Layer w9.84: v3(1141,906) 1142.21,907.21 1142.21,1156.21 1546,1560 1968.75,1560 2231.83,1823.09 2231.83,1846.83 v1(2232,1847)
PIN: C1.1 CR1.1 J4.A Q1.3 | length 67.7
  Top Layer w9.84: 1215,2609 1219,2605 CR1.1@1281,2605
PPHV: C29.1 C30.1 C31.1 C32.1 C33.1 C34.1 C59.1 C60.1 C61.1 Q1.2 R21.1 R23.2 R24.1 U1.1 U5.6 U10.20 U10.21 U10.22 | length 1349.3
  Top Layer w8: v1(2294,1941) 2313.19,1921.81 U1.1@2313.19,1901.12
  Top Layer w20: 800,2285 800,2366 869,2435 869,2506.81 889.79,2527.6 893.6,2527.6 906,2540 U5.6@920,2540
  Bottom Layer w8: v1(1415,2200) 1550,2065 2170,2065 v1(2294,1941)
PROCHOT: U1.11 U1R.36 | length 1697.4
  Top Layer w9.84: U1R.36@1177.41,868.96 1178.39,869.94 1178.39,942.8 v1(1190.59,955) ; v1(2362.76,1733.02) 2362.76,1735.31 2365.19,1737.75 U1.11@2365.19,1756.43
  Bottom Layer w9.84: v1(1190.59,955) 1190.59,1103.59 1567,1480 2109.73,1480 v1(2362.76,1733.02)
QSPI_SCLK_RP2040: U1R.52 U2R.6 | length 271
  Top Layer w8: U2R.6@862.41,785.54 884.22,807.35 921.3,807.35 942.41,786.25 942.41,739.12 987.28,694.25 U1R.52@1049.95,694.25
QSPI_SD0_RP2040: U1R.53 U2R.5 | length 195.9
  Top Layer w8: U2R.5@912.41,764.12 912.61,763.91 912.61,724.9 959.01,678.5 U1R.53@1049.95,678.5
QSPI_SD1_RP2040: U1R.55 U2R.2 | length 435.8
  Top Layer w8: U2R.2@812.41,484.12 812.41,462.71 833.22,441.89 922.3,441.89 942.41,462 942.41,604.12 985.29,647.01 U1R.55@1049.95,647.01
QSPI_SD2_RP2040: U1R.54 U2R.3 | length 299.4
  Top Layer w8: U2R.3@862.41,484.36 862.41,549.12 975.98,662.69 1049.88,662.69 U1R.54@1049.95,662.76
QSPI_SD3_RP2040: U1R.51 U2R.7 | length 322.4
  Top Layer w8: U2R.7@812.41,792.61 843.91,824.12 923.66,824.12 926.43,821.35 927.1,821.35 962.77,785.69 962.77,743.76 996.53,710 U1R.51@1049.95,710
QSPI_SS_RP2040: R5R.2 R7R.2 U1R.56 U2R.1 | length 1014.3
  Top Layer w8: U2R.1@762.41,489.12 762.41,462.57 794.62,430.35 930.56,430.35 956.99,456.78 993.71,493.5 R5R.2@993.71,524.12 993.71,600.42 1024.54,631.26 U1R.56@1049.95,631.26 ; U1R.56@1063.17,631.26 1074.54,631.26 1082.41,639.12 v3(1282.87,639.12) ; v3(1392.41,674.12) 1422.41,644.12 1422.41,624.12 1447.41,599.12 1507.41,599.12 R7R.2@1532.41,574.12 ; R7R.2@1528.06,569.73 R7R.2@1528.71,570.38
  Bottom Layer w8: v3(1282.87,639.12) 1357.41,639.12 v3(1392.41,674.12)
REGN: C7.2 R9.1 U1.28 | length 499.8
  Top Layer w8: v1(2092.5,1779.5) R9.1@2092.5,1802.54 ; U1.28@2397.09,1936.49 2397.09,1951.53 2410.02,1964.47 2410.02,1967.76 2401.91,1975.88 2401.91,2003.84 C7.2@2399.75,2006
  Bottom Layer w8: v1(2092.5,1779.5) 2181.02,1868.02 2317.55,1868.02 2406,1956.48 2406,1960.45 2408.88,1963.33 v1(2408.88,1966.12)
RUN_RP2040: J1R.4 R4R.2 R6R.2 U1R.26 | length 1275.7
  Top Layer w8: U1R.26@1320.61,804.49 1320.68,804.55 1408.73,804.55 1448.3,844.12 1667.41,844.12 1777.41,954.12 v3(1857.41,954.12) R4R.2@1857.41,994.12 ; J1R.4@1941.91,776.25 1979.78,814.12 2081.41,814.12 ; v3(2041.83,952.39) 2081.41,912.81 2081.41,814.12 ; R6R.2@2122.41,689.12 2122.41,773.12 2081.41,814.12
  Bottom Layer w8: v3(1857.41,954.12) 1858.27,953.26 2040.96,953.26 v3(2041.83,952.39)
SBU1: J1.A8
SBU2: J1.B8
SCK_RP2CAN: U1C.10 U1R.29 | length 398.2
  Top Layer w8: U1R.29@1287.64,868.96 1287.64,882.12 1303.84,898.31 1457.15,898.31 1592.96,1034.12 U1C.10@1609.69,1034.12
SCL: J3.44 R28.2 U1.13 U1R.41 U10.9 | length 4270.5
  Top Layer w8: U10.9@386.79,2103 386.79,1523.21 500,1410 v1(946,1410) ; R28.2@970,1205 970,1101 1071,1000 1071,911.93 1083.17,899.77 1083.69,899.77 1098.6,884.86 U1R.41@1098.6,882.18 ; v1@970,1250 1100,1380 2220,1380 2426.69,1586.69 2426.69,1713.51 2397.09,1743.11 U1.13@2397.09,1754.92 ; R28.2@971.89,1205 v1@971.89,1249 ; U1R.41@1098.67,868.96 1098.67,816.64 1105.26,810.04 v1(1105.26,766)
  Top Layer w9.84: J3.44@1091.2,224 1092.19,224.98 1092.19,249.84 1100.12,257.77 1100.12,274.63 v3(1102.83,277.34)
  Bottom Layer w8: v1(946,1410) 948,1410 948,1408 969.13,1386.87 969.13,1321.18 970,1320.31 v1@970,1250
  Bottom Layer w9.84: v3(1102.83,277.34) 1101.98,278.18 1101.98,458.02 1027.76,532.24 1027.76,689.76 1104,766 v1(1105.26,766)
  other v1: 971.89,1250
SCLK: J3.36 U1R.13 | length 383.9
  Top Layer w8: J3.36@1248.69,224 1248.69,313.69 1271.89,336.89 U1R.13@1271.89,598.29
SCRNREST: J3.10 J3.47 U1R.6 | length 1294.3
  Top Layer w8: J3.47@1032.15,224 1032.34,224.19 1032.34,260.61 1037.04,265.3 1037.04,297.04 1169,429 1169,490 1161.66,497.34 U1R.6@1161.66,598.29 ; v1(1757,271) 1757,268.21 1760.5,264.72 J3.10@1760.5,224
  Top Layer w12: J3.47@1032.15,224 1032.15,196.85 v1(1049,180)
  Bottom Layer w8: v1(1049,180) 1049,179.57 1066.57,162 1648,162 v1(1757,271)
SDA: J3.45 R29.2 U1.12 U1R.40 U10.8 | length 4223.4
  Top Layer w8: U10.8@371.04,2103 371.04,1478.96 481,1369 1010,1369 v1(1011,1368) 1056.38,1413.38 2203.87,1413.38 2411.69,1621.2 2411.69,1712.18 2381.34,1742.53 U1.12@2381.34,1754.92 ; v1(1008,1233) 1008,1101.48 1098,1011.48 1098,902.95 1114.35,886.6 U1R.40@1114.41,868.96 U1R.40@1114.41,868.96 1114.41,834.49 1119.2,829.7 v1(1121.15,829.7)
  Top Layer w9.84: J3.45@1071.52,224 1071.99,224.47 v3(1071.99,264.38)
  Bottom Layer w8: v1(1008,1233) 1009.5,1234.5 1009.5,1366.5 v1(1011,1368)
  Bottom Layer w9.84: v3(1071.99,264.38) 1071.99,467.26 1014.37,524.88 1014.37,706.37 1119.53,811.53 1119.53,828.08 v1(1121.15,829.7)
SR_N: R27.2 U1.19 | length 1751.3
  Top Layer w8: U1.19@2464.81,1822.38 U1.19@2465.02,1822.59 ; U1.19@2466.76,1822.13 2543.13,1822.13 2673,1952 2793.37,1952 2915.37,1830 3520,1830 3581,1891 3960.13,1891 4000.5,1931.37 4000.5,1953.5 R27.2@4035,1988
SR_P: R26.2 U1.20 | length 1726.4
  Top Layer w8: U1.20@2464.81,1838.13 2466.76,1838.13 2536.5,1838.13 2666.37,1968 2800,1968 2922,1846 3513.37,1846 3574.37,1907 3953.5,1907 3984.5,1938 3984.5,1953.5 R26.2@3950,1988
SRX: J3.33 U1R.15 | length 426.2
  Top Layer w8: J3.33@1307.74,224 1309.61,225.87 1309.61,253.61 1337,281 1337,585 1320.61,601.39 U1R.15@1320.61,631.26
STX: J3.34 U1R.14 | length 395.1
  Top Layer w8: U1R.14@1287.64,598.29 1287.64,572.36 1313,547 1313,294 1288.06,269.06 J3.34@1288.06,224
SW1: C27.2 L3.2 U1.32 U6.1 U6.2 U6.3 U9.5 U9.6 U9.7 U9.8 U9.9 | length 581.3
  Top Layer w8: C27.2@2296.91,2006 2296.91,1972.06 2331.89,1937.08 2333.67,1937.08 2333.88,1936.87 U1.32@2333.88,1924.35
  Top Layer w9.84: 2075,2400 2092,2383
  Top Layer w20: 2092,2383 2092,2323 2290.46,2124.54 C27.2@2290.46,2006
SW2: C28.2 L3.1 U1.23 U7.1 U7.2 U7.3 U8.5 U8.6 U8.7 U8.8 U8.9 | length 1088.6
  Top Layer w8: U1.23@2466.76,1885.37 2490.37,1885.37 2596.09,1991.09 C28.2@2596.09,2078
  Top Layer w9.84: L3.1@2675.96,2492 L3.1@2675.96,2668 L3.1@2711.54,2632.41
  Top Layer w20: C28.2@2596.09,2078 2711.54,2193.46 L3.1@2711.54,2632.41
SWCLK_RP2040: J1R.3 U1R.24 | length 602.9
  Top Layer w8: U1R.24@1320.61,772.99 1421.28,772.99 1462.41,814.12 1792.41,814.12 ; 1793.47,814.12 1854.03,814.12 J1R.3@1891.91,776.25
SWDIO_RP2040: J1R.1 U1R.25 | length 713.8
  Top Layer w8: U1R.25@1320.61,788.74 1415.4,788.74 1455.78,829.12 1674.58,829.12 1782.2,936.75 1841.97,936.75 1881.41,897.31 1881.41,842.43 1891.91,831.93 J1R.1@1891.91,826.25
TEARING: J3.39 U1R.8 | length 375.6
  Top Layer w8: J3.39@1189.63,224 1189.63,371.63 1209,391 1209,537 1193.22,552.78 U1R.8@1193.22,585.06
TERM_DET_RP2CAN: R1C.2 SW1C.3 U1C.9 | length 816.7
  Top Layer w8: v3(1552.41,959.12) 1576.34,983.06 1608.63,983.06 U1C.9@1609.69,984.12 R1C.2@1687.41,984.12 ; SW1C.3@2139.3,885.91 2154.99,870.22 SW1C.3@2159.57,870.22
  Top Layer w9.84: v3(2052.41,984.12) 2052.41,981.08 2139.3,894.18 SW1C.3@2139.3,885.91
  Bottom Layer w8: v3(1552.41,959.12) 1702.41,959.12 1727.41,984.12 v3(2052.41,984.12)
USB_N: J1.A7 J1.B7 R3R.1 SB2.2 | length 3051.7
  Top Layer w8: SB2.2@340,2823.5 356,2839.5 363.31,2839.5 370.91,2847.1 370.91,2856.61 377.15,2862.85 377.15,2875.06 371,2881.21 v1(371,2884) 371,2886.5 380.16,2895.66 J1.A7@380.16,2925.16 380.16,2981.84 352,3010 190,3010 70,2890 70,1586 705,951 820.76,951 838.88,969.12 R3R.1@853.71,969.12 ; J1.B7@419.53,2925.16 421.43,2923.25 421.43,2901.67 421.97,2901.12 421.97,2865.84 v1(423.72,2864.09)
  Bottom Layer w8: v1(371,2884) 372.97,2882.03 372.97,2867.8 383.3,2857.47 404.75,2857.47 410.59,2863.31 422.93,2863.31 v1(423.72,2864.09)
USB_P: J1.A6 J1.B6 R2R.1 SB1.2 | length 3134.2
  Top Layer w8: v1(360.25,2965.25) 360.36,2965.14 360.36,2925.27 J1.B6@360.47,2925.16 ; SB1.2@410,2823.5 394,2839.5 389.6,2839.5 384.91,2844.19 384.91,2850.81 391.15,2857.05 391.15,2872.9 398.72,2880.48 v1(398.72,2882.74) 399.84,2883.86 399.84,2906.52 399.84,2921.35 401.75,2923.25 397.94,2927.06 397.94,2986.69 358.63,3026 183.37,3026 54,2896.63 54,1579.37 698.37,935 821.82,935 R2R.1@853.71,903.11
  Bottom Layer w8: v1(360.25,2965.25) 360.25,2938.58 396.75,2902.08 396.75,2884.71 v1(398.72,2882.74)
USB_RP2040_N: R3R.2 U1R.46 | length 271.3
  Top Layer w8: R3R.2@891.11,969.12 895.01,965.22 895.01,948.8 899.69,944.12 915.29,944.12 930.32,929.09 930.32,863.84 942.27,851.89 942.27,850.28 975.6,816.95 975.6,813.81 1001.11,788.3 1036.34,788.3 U1R.46@1036.72,788.68
USB_RP2040_P: R2R.2 U1R.47 | length 283.1
  Top Layer w8: R2R.2@891.11,903.11 895.01,907.01 895.01,923.43 899.69,928.12 908.66,928.12 914.32,922.46 914.32,857.21 960.73,810.8 960.73,807.66 994.95,773.44 1036.34,773.44 1036.78,772.99 U1R.47@1049.95,772.99
VBAT: C25.1 C26.1 C43.1 J2.6 Q2.2 R22.2 R27.1
VBUSIN: C21.2 C23.2 C48.1 C49.1 C50.1 C51.1 C52.1 C67.1 C68.1 CR2.1 J1.A4-B9 J1.B4-A9 U10.23 U10.24 U10.25 U10.32 U10.33 | length 124.1
  Top Layer w9.84: J1.A4-B9@484.49,2925.16 484.49,2849.51 CR2.1@503,2831
  Top Layer w24: v1(295.32,2882.68) J1.B4-A9@295.32,2904.96
  other v1: 620,2222 596,2234 641,2241 616,2259 584,2260 575,2290 440,2315 575,2320 549,2715 499,2716 477,2736 522,2736 561,2743 508,2761 535,2761 477,2767 513,2803 479,2804
VDDA: C9.1 R2.1 R9.2 R13.1 U1.7 | length 840.9
  Top Layer w8: C9.1@2159,1836 2164,1836 2197,1803 2249.73,1803 2256.41,1796.32 2271.56,1796.32 2271.88,1796 2282.51,1806.63 U1.7@2298.51,1806.63
  Top Layer w20: R13.1@2019,1829 2026,1836 R9.2@2092.5,1836 C9.1@2159,1836 ; R2.1@2740,1790 2741,1789 v1(2741,1745)
  Bottom Layer w8: v1(2270,1796) 2308.65,1757.35 2524.26,1757.35 2536.61,1745 v1(2741,1745)
VSYS: C15.1 C19.2 C20.2 C24.1 C35.1 C36.1 C37.1 C38.1 C39.1 C40.1 C41.1 C42.1 Q3.1 Q3.2 Q3.3 U1.22 U3.2 U3.3 U3.11 U7.5 U7.6 U7.7 U7.8 U7.9 | length 1859.8
  Top Layer w8: U1.22@2466.76,1869.62 2498.62,1869.62 2814,2185 2900,2185 ; U3.11@3156.09,1028.84 3156.44,1029.19 3177.99,1029.19 v1(3178.98,1030.18)
  Top Layer w40: v2(2921,1737) 3081,1577 3081,1221 2975.14,1115.14 2959.62,1115.14 C15.1@2956,1111.52
  Bottom Layer w8: v1(3006,1018) 3165.08,1018 3177.26,1030.18 v1(3178.98,1030.18)
  Bottom Layer w40: v2(2921,1737) 2921,2035 v2(2952,2066)
XIN_RP2040: C1R.1 U1R.20 Y1R.1 | length 406.7
  Top Layer w8: U1R.20@1320.61,710 1421.53,710 1452.41,679.12 1452.41,641.77 1465.95,628.23 1528.31,628.23 1562.41,662.32 Y1R.1@1562.41,668.23 1599.78,668.23 1618.59,649.41 1639.1,649.41 C1R.1@1642.41,646.1
XOUT_RP2040: R1R.1 U1R.21 | length 64.3
  Top Layer w8: U1R.21@1320.61,725.75 1364.92,725.75 1366.64,727.47 1370.58,727.47 1377.41,734.29 R1R.1@1377.41,738.23
pads on no net: J1.1 J1.2 J1.3 J1.4 J1R.A J1R.B J1R.C J1R.D J1R.E J1R.F J1R.G J2. J3.4 J3.5 J3.6 J3.S1 J3.S2 SW1R.A1 SW2R.A2 U1.14 U1C.3 U1C.5 U1C.8 U2.5 U2.6 U2.12 U2.13 U3.6 U3.7 U3.8 U3.9 U5.4 U10.15 U10.30 U10.40 U10.59 U10.60 U10.61 U10.62 U10.63 U10.64

## Polygon pours and split planes (outlines as drawn)
PPHV on Top Layer "PPHV_L01_P062" (solid, pour order 62): 552.91,2200.12 558.5,2194.53 634.53,2194.53 790,2350 1035,2350 1050,2365 1050,2510 1080,2510 1180,2410 1180,2325 1205,2300 1380,2300 1500,2300 1500,2000 1480,1980 1440,1980 1410,2010 1410,2030 1385,2055 1090,2055 1045,2100 860,2100 840,2080 840,1965 900,1905 900,1720 860,1680 500,1680 460,1720 460,1950 548.98,2038.98 548.98,2196.18
3V3 on Top Layer "3V3_L01_P095" (solid, pour order 95): 2610,900 2180,470 1890,470 1774.33,354.33 1774.33,200 1830,200 1830,260 1930,260 1930,200 2400,200 2580,380 2580,480 2700,600 2700,900
GND on Top Layer "GND_L01_P109" (solid, remove dead copper, pour order 109): 947.01,278 1024,278 1024,148 948,148 946,150
GND on Top Layer "GND_L01_P083" (solid, pour order 83): 4130,1840 3640,1840 3640,640 3710,570 4470,570 4540,640 4540,1170 4460,1250 4260,1250 4140,1370 4140,1830
5V on Top Layer "5V_L01_P066" (solid, pour order 66): 422.99,2322.01 353,2392 313,2392 235,2470 190,2470 190,2320 205,2305 385,2305 395.43,2294.57 395.43,2240.8 422.99,2240.8
GND on Top Layer "GND_L01_P108" (solid, pour order 108): 412.21,2159.84 547,2159.84 547,2081.34 529.66,2064 437,2064 414.75,2086.25
VSYS on Top Layer "VSYS_L01_P105" (solid, pour order 105): 2920,1133 2921,1134 3004,1134 3062,1076 3062,1001 2978,1001 2977,1000 2919,1058 2919,1065
GND on Top Layer "GND_L01_P104" (solid, pour order 104): 1321,248 1322,248 1351,277 1730,277 1730,276 1750,256 1750,196 1323,196 1322,195
NetC11_2 on Top Layer "NETC11_2_L01_P100" (solid, pour order 100): 3430,1090 3370,1030 3026,1030 3026,1136 3050,1160 3430,1160
3V3 on Top Layer "3V3_L01_P098" (solid, pour order 98): 1125,249.82 1125,192.1 1165.38,140 1790,140 1825,175 1825,260 1790,260 1779.82,249.82
5V on Top Layer "5V_L01_P097" (solid, pour order 97): 2830,910 2830,770 2940,660 3070,660 3160,750 3320,750 3410,840 3410,900 3120,900 3080,940 3080,980 3060,980 2990,910 2970,910
3V3 on Top Layer "3V3_L01_P096" (solid, pour order 96): 1710,360 1710,340 1790,260 1790,360
3V3 on Top Layer "3V3_L01_P093" (solid, pour order 93): 485,680 520,680 520,720 563,720 563,665 615,665 720,560 725,565 725,925 690,925 485,720
VSYS on Top Layer "VSYS_L01_P087" (solid, remove dead copper, pour order 87): 2872,2100 2872,2739 2982,2849 2982,2914 3482,2914 3482.53,2913.47 3487.13,2145 3377.51,2145 3377.51,2016.3 2940,2020
VBAT on Top Layer "VBAT_L01_P092" (solid, pour order 92): 3992,2113 4003,2102 4003,2138 3992,2127
NetC43_2 on Top Layer "NETC43_2_L01_P091" (solid, pour order 91): 3986,2125 3974,2137 3973,2137 3973,2105 3972,2104 3972,2101 3986,2115
SW2 on Top Layer "SW2_L01_P086" (solid, remove dead copper, pour order 86): 2617,2427 2817,2427 2819,2429 2819,2647 2857,2647 2858,2648 2858,2800 2883,2800 2883,2920 2621,2920 2618,2920
SW1 on Top Layer "SW1_L01_P084" (solid, remove dead copper, pour order 84): 2147,2945.62 1890,2945.62 1754,2805.89 1754,2445 1781,2418 1781,2381 2146,2381 2147,2382
NetC18_1 on Top Layer "NETC18_1_L01_P071" (solid, pour order 71): 1630,2359 1875,2359 1875,2005 1855,1985 1655,1985 1640,2000 1640,2045 1630,2055
3V3 on Top Layer "3V3_RP2040" (solid, remove dead copper, pour order 59): 708.87,1256.91 2128.87,1256.91 2128.87,336.91 708.87,336.91
DrainLED on Top Layer "DRAINLED_L01_P082" (solid, pour order 82): 4230,2020 4590,2020 4590,1720 4230,1720 4190,1760 4190,1980
VBAT on Top Layer "VBAT_L01_P077" (solid, pour order 77): 4000,2030 4000,2402 3984,2418 3984,2484 4037,2537 4113,2537 4245,2405 4245,2060 4215,2030
NetC43_2 on Top Layer "NETC43_2_L01_P076" (solid, pour order 76): 3780,2275 3840,2335 3930,2335 3975,2290 3975,2030 3850,2030 3780,2100
NetF1_1 on Top Layer "NETF1_1_L01_P075" (solid, pour order 75): 3675.1,2284.55 3764,2284.55 3764,2144 3723.45,2103.45 3675.1,2103.45 3675.1,2278.84
PIN on Top Layer "PIN_L01_P069" (solid, remove dead copper, pour order 69): 915,2740 990,2815 1195,2815 1245,2765 1245,2570 1210,2535 980,2535 915,2600
LDO_3V3 on Top Layer "LDO_3V3_L01_P068" (solid, pour order 68): 347,2236 347,2181 233,2181 233,2226 243,2236
VBUSIN on Top Layer "VBUSIN_L01_P065" (solid, pour order 65): 453.99,2240.51 453.99,2291.99 453.99,2326.84 443.99,2336.84 423.99,2336.84 413.99,2326.84 413.99,2280.51
VBUSIN on Top Layer "VBUSIN_L01_P061" (solid, pour order 61): 552.03,2207.65 632.65,2207.65 661,2236 661,2749 505,2905 500,2905 475,2905 460,2890 460,2715 490,2685 490,2580 560,2510 560,2258.39 552.03,2250.41
no net on Top Overlay "NONET_L-01_P-001" (solid): 4370,2737 4318,2685 4318,2684 4372,2684 4373,2683
no net on Top Overlay "NONET_L-01_P-001" (solid): 4364.5,1743.5 4418.5,1797.5 4420.5,1797.5 4420.5,1741.5 4417.5,1738.5
no net on Top Overlay "NONET_L-01_P-001" (solid): 4364,1989 4418,2043 4420,2043 4420,1987 4417,1984
no net on Top Overlay "NONET_L-01_P-001" (solid): 1296.37,3000.55 1239,2943.18 1239,3007 1238,3008
no net on Top Overlay "NONET_L-01_P-001" (solid): 600.35,3023 657.65,3023 657.65,3020.15 600.35,2962.85
no net on Top Overlay "NONET_L-01_P-001" (solid): 3736.52,1864.24 3736.52,1813.24 3787.52,1864.24
no net on Top Overlay "NONET_L-01_P-001" (solid): 2878,1343 2878,1283 2938,1343
no net on Top Overlay "NONET_L-01_P-001" (solid): 245.73,1345.07 245.73,1285.07 309.73,1345.07
no net on Top Overlay "NONET_L-01_P-001" (solid): 2294,2196 2294,2126 2364,2196
no net on Top Overlay "NONET_L-01_P-001" (solid): 1047.41,1349.12 1047.41,1289.12 1107.41,1349.12
GND on Mid Layer 1 "GND_L02_P106" (solid, pour order 106): 0,3200 4700,3200 4700,0 0,0
GND on Bottom Layer "GND_L04_P110" (solid, remove dead copper, pour order 110): 8,3214 38,3184 4687,3184 4687,-8 4682,-13 4657,12 -2,12
VBUSIN on Bottom Layer "VBUSIN_L04_P063" (solid, pour order 63): 285,2990 310,2990 325,2975 325,2865 365,2825 515,2825 575,2765 575,2715 560,2700 485,2700 450,2735 345,2735 285,2795
NetC11_2 on Bottom Layer "NETC11_2_L04_P102" (solid, pour order 102): 420,2320 420,2325 425,2325
VBUSIN on Bottom Layer "VBUSIN_L04_P101" (solid, pour order 101): 420,2330 575,2330 670,2235 670,2215 655,2200 585,2200 555,2230 555,2260 545,2270 440,2270 420,2290 420,2320
GND on Mid Layer 2 "GND_L03_P107" (solid, pour order 107): 0,3200 4700,3200 4700,0 0,0

## Keep-outs
Keep-Out Layer:
  region: 4700,500 4400,500 4200,300 4200,0 4700,0
  region: 4200,3200 4200,2900 4400,2700 4700,2700 4700,3000 4500,3200
  region: 1250,3200 1250,2850 1350,2750 1650,2750 1750,2850 1750,3200
  region: 0,500 300,500 500,300 500,0 200,0 0,200
  lines w10: 6850,-800 ccw(c6850,-550) 7100,-550 7100,2950
  lines w30: 0,200 0,3000 200,3200 4500,3200 4700,3000 4700,200 4500,0 200,0 0,200

## Other copper
Top Layer:
  pour cut-out: 1252.41,738.35 1302.41,688.35 1302.41,643.35 1212.41,643.35 1212.41,678.35
  pour cut-out: 1592.41,1254.12 1382.41,1254.12 1377.41,1249.12 1377.41,999.12 1517.41,999.12 1607.41,1059.12
  pour cut-out: 1162.19,631.26 1162.41,631.48 1162.41,848.23 1109.79,848.23 1082.47,820.91 1082.47,748.3 1067.41,733.23 1067.41,633.23
  pour cut-out: 1960.41,868.81 1956.35,858.07 1956.35,825.18 1962.41,819.12 1992.41,819.12 1992.41,844.12 1982.41,854.12

## Silkscreen, mask and mechanical layers (free items; w line width, h text height)
Top Overlay:
  drawing of 48 lines, arcs and shapes, not listed
  text "USB-C" at 610.89,3170 h60 r270
  text "12-24V" at 1250,3168 h60 r270
  text "SBH PINOUT" at 4380,2690.89 h60
  text "GND" at 4235,2600.74 h50
  text "SNS2" at 4390,2600.74 h50
  text "SNS1" at 4545,2600.74 h50
  text "CAN H" at 4215,2470.74 h50
  text "CAN L" at 4375,2470.74 h50
  text "V BAT" at 4530,2470 h50
  text "Charging Chip" at 1939,2146.27 h60
  text "Fan" at 4409.33,1900 h60 r90
  text "Drain" at 3609.41,1823.79 h60
  text "LED - +" at 4410,1580 h60 r90
  text "Speaker" at 38,1304.6 h60
  text "Microcontroller" at 677.41,1299.79 h60
  text "Power Conversion" at 2445,1293.89 h60
  text "TERM / ON" at 2129.1,1049.12 h40
  text "BOOT" at 1720.79,409.14 h40
  text "RESET" at 1935.8,409.14 h40
  text "Screen" at 2070.89,200 h60 r270
  text "The Underwater Robotics Team" at 2440,171.33 h90
  text "SBH Charger" at 2440,75.66 h90